# Allegro board proiectCAD.brd
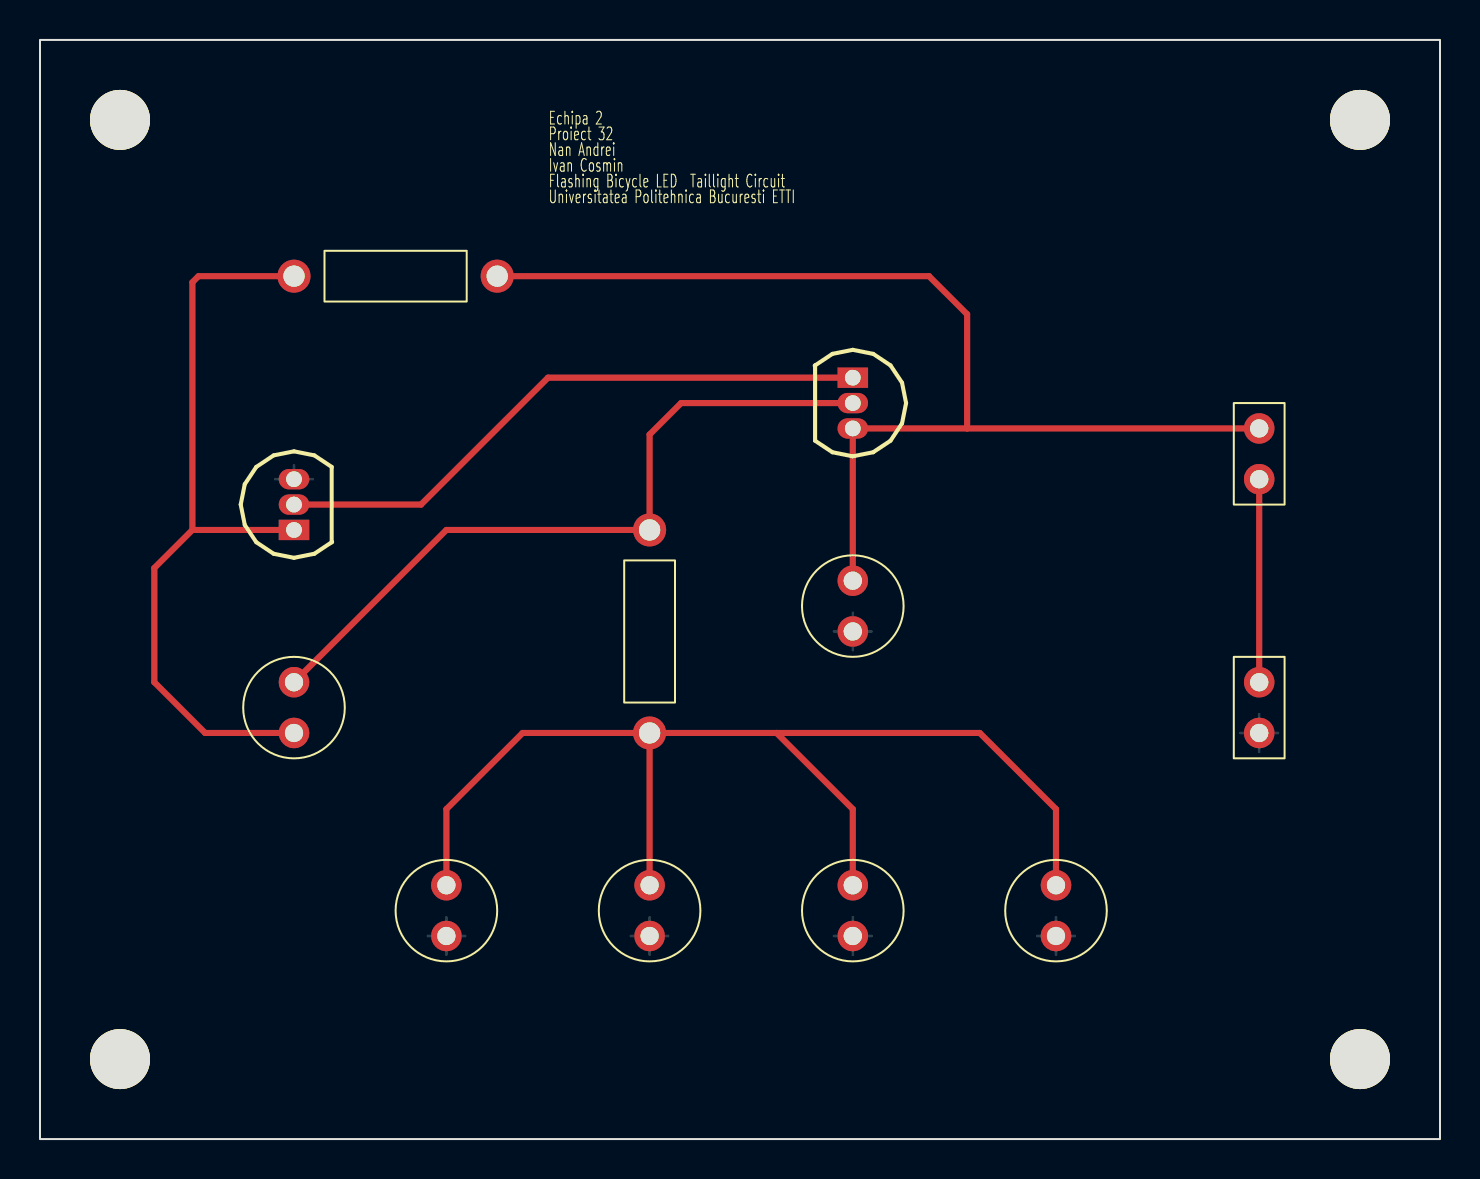
[diagram p0: board, top side]
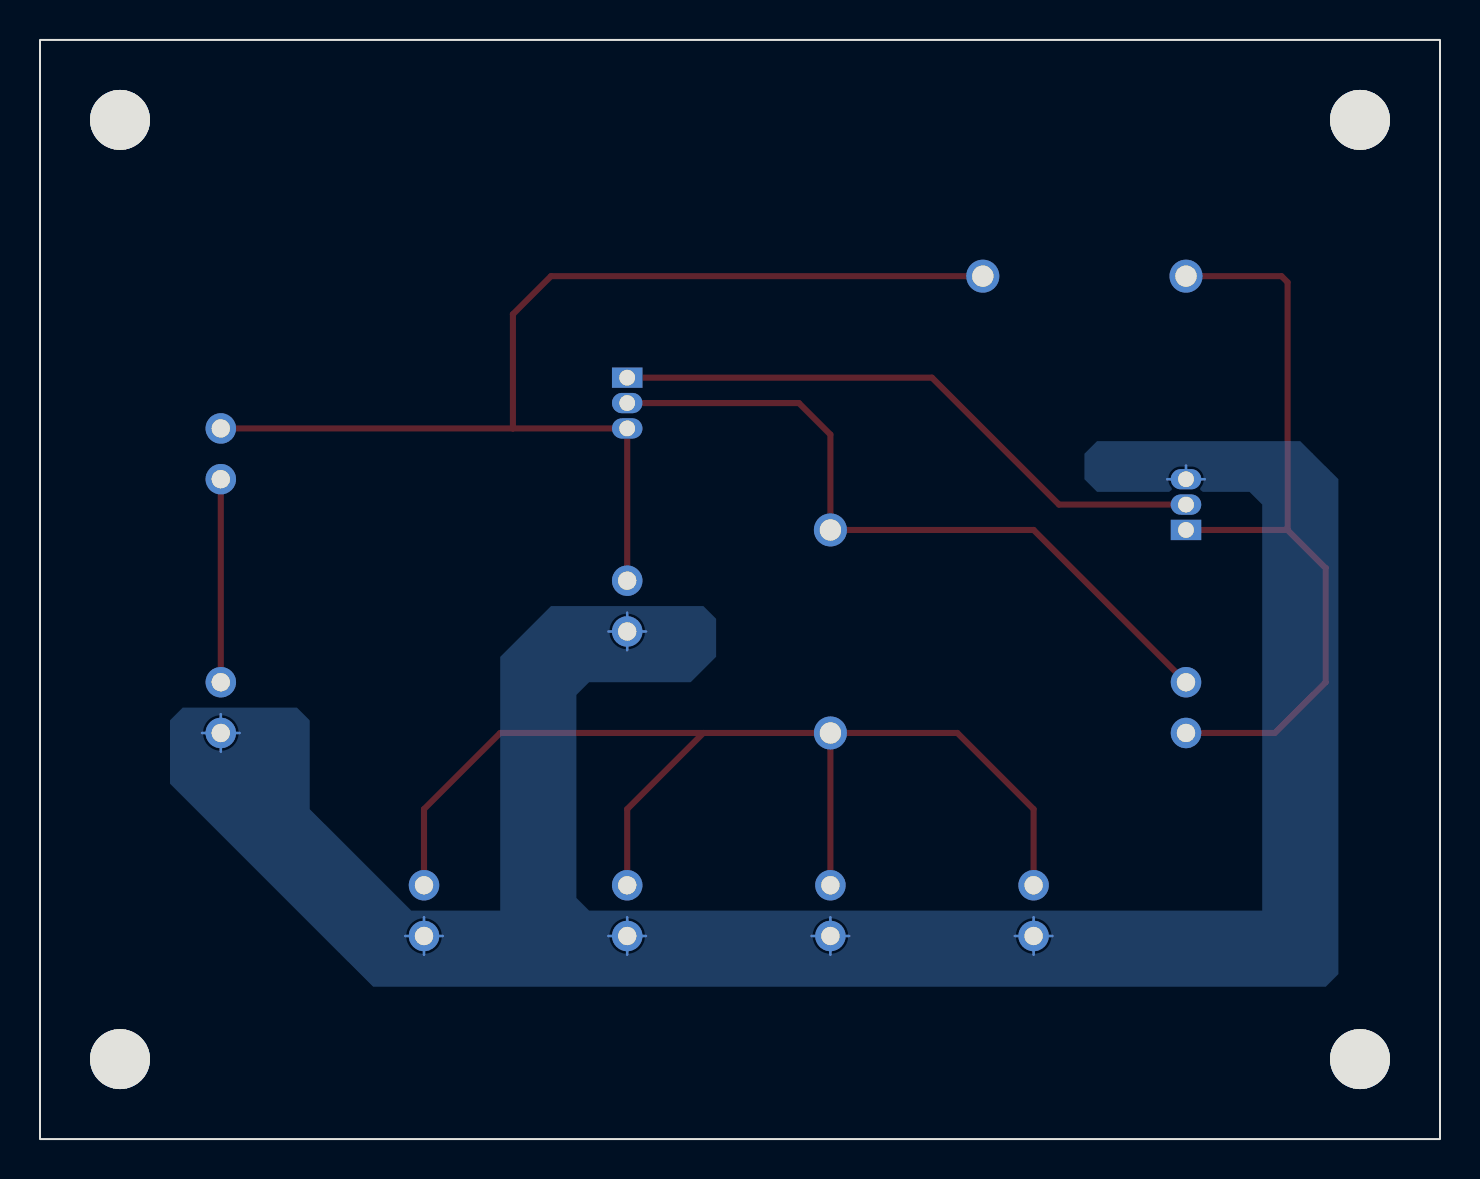
[diagram p1: board, bottom side, seen from below]

Outline 70 x 55 mm; copper layers: TOP, BOTTOM. Coordinates in mm from the lower left corner of the outline.
Outline path: rectangle 0,0 70,55

## Design rules (mm)
constraint set DEFAULT: min track width 0.127

## Placement (name value [footprint] x y rotation side)
B1  3.7V  [JUMPER2]  60.96 22.86 270 top
C1  22uF  [CAP196]  12.7 22.86 180 top
C2  10uF  [CAP196]  40.64 27.94 180 top
D1  LED  [CAP196]  20.32 12.7 180 top
D2  LED  [CAP196]  30.48 12.7 180 top
D3  LED  [CAP196]  40.64 12.7 180 top
D4  LED  [CAP196]  50.8 12.7 180 top
NOREF  -  [unnamed]  4 4 0 top
NOREF#2  -  [unnamed]  66 51 0 top
NOREF#3  -  [unnamed]  66 4 0 top
NOREF#4  -  [unnamed]  4 51 0 top
Q1  2N3904  [TO92]  12.7 30.48 90 top
Q2  2N3906  [TO92]  40.64 38.1 270 top
R1  56K  [RES400]  22.86 43.18 90 top
R2  15  [RES400]  30.48 30.48 180 top
S1  ON-OFF  [JUMPER2]  60.96 35.56 270 top

## Library data of the parts
B1 = Battery: User Part Number: ***
C1 C2 = CAP POL: Tolerance: ***; User Part Number: ***
D1-D4 = LED: Tolerance: ***; User Part Number: ***
Q1 = NPN BCE
Q2 = PNP BCE
R1 R2 = R: Tolerance: ***; User Part Number: ***
S1 = Switch: User Part Number: ***

## Footprints (pads in the part's own frame, mm; a bottom-side part is the same pattern mirrored in y, then rotated)
CAP196
  round 1.524 hole 0.914: 1(0,0) 2(0,2.54)
JUMPER2
  round 1.524 hole 0.914: 1(0,0) 2(2.54,0)
RES400
  round 1.651 hole 1.067: 1(0,0) 2(0,10.16)
TO92
  rect 1.016x1.524 hole 0.787: 1(0,0)
  oval 1.016x1.524 hole 0.787: 2(1.27,0) 3(2.54,0)
unnamed
  round 3 hole 3.2 unplated: (0,0)

## Nets
GND: B1.2 C2.2 D1.2(CATHODE) D2.2(CATHODE) D3.2(CATHODE) D4.2(CATHODE) Q1.3(E)
N02440: C2.1 Q2.3(E) R1.1 S1.1(OUT)
N02498: Q1.2 Q2.1
N02506: C1.1 Q2.2 R2.1
N02510: C1.2 Q1.1 R1.2
N02588: B1.1 S1.2
N02640: D1.1 D2.1 D3.1 D4.1 R2.2

## Routing (per net, layer and track width the routed paths; a pad name or vN(x,y) marks a point on that pad's centre or on a via; arc(x,y) is an arc through that point)
GND: length 25.1
  BOTTOM w0.127: D1.2 20.32,11.1 ; D1.2 21.26,10.16 ; D1.2 19.38,10.16 ; D1.2 20.32,9.22 ; 11.76,33.02 Q1.3 ; Q1.3 12.7,33.71 ; Q1.3 13.64,33.02 ; 30.48,9.22 D2.2 ; D2.2 29.54,10.16 ; D2.2 31.42,10.16 ; D2.2 30.48,11.1 ; C2.2 40.64,26.34 ; C2.2 40.64,24.46 ; C2.2 41.58,25.4 ; C2.2 39.7,25.4 ; 60.02,20.32 B1.2 ; B1.2 60.96,19.38 ; B1.2 60.96,21.26 ; B1.2 61.9,20.32 ; D4.2 50.8,11.1 ; D4.2 49.86,10.16 ; D4.2 50.8,9.22 ; D4.2 51.74,10.16 ; 40.64,9.22 D3.2 ; D3.2 41.58,10.16 ; D3.2 39.7,10.16 ; D3.2 40.64,11.1
N02440: length 57.9
  TOP w0.305: 46.35,35.56 46.35,41.27 44.45,43.18 R1.1 ; 46.35,35.56 Q2.3 C2.1 ; 46.35,35.56 S1.1
N02498: length 30.6
  TOP w0.305: Q2.1 25.4,38.1 19.05,31.75 Q1.2
N02506: length 36.5
  TOP w0.305: Q2.2 32.05,36.83 30.48,35.26 R2.1 20.32,30.48 C1.1
N02510: length 39.1
  TOP w0.305: 7.62,30.48 7.62,42.88 7.92,43.18 R1.2 ; 7.62,30.48 Q1.1 ; 7.62,30.48 5.71,28.57 5.71,22.86 8.26,20.32 C1.2
N02588: length 10.2
  TOP w0.305: S1.2 B1.1
N02640: length 58.1
  TOP w0.305: D4.1 50.8,16.51 46.99,20.32 36.83,20.32 ; R2.2 D2.1 ; R2.2 36.83,20.32 ; R2.2 24.13,20.32 20.32,16.51 D1.1 ; 36.83,20.32 40.64,16.51 D3.1

## Copper pours and planes (outline as drawn; the poured copper is in the pictures)
GND on BOTTOM: 57.15,21.59 62.87,21.59 63.5,20.95 63.5,17.78 53.34,7.62 5.71,7.62 5.08,8.26 5.08,33.02 6.99,34.92 17.14,34.92 17.78,34.29 17.78,33.02 17.14,32.38 9.53,32.38 8.89,31.75 8.89,11.43 42.55,11.43 43.18,12.06 43.18,22.23 42.55,22.86 37.47,22.86 36.2,24.13 36.2,26.04 36.83,26.67 44.45,26.67 46.99,24.13 46.99,11.43 51.44,11.43 56.52,16.51 56.52,20.95

## Text on the board
Ref Des/Silkscreen Top: Echipa 2 | Proiect 32 | Nan Andrei | Ivan Cosmin | Flashing Bicycle LED  Taillight Circuit | Universitatea Politehnica Bucuresti ETTI
